# Altium PCB PS_DC-DC_15V_24V.PcbDoc (part 1 of 2)
Units mm, origin at the board's own origin, x right, y up, seen from the top; angles counter-clockwise.
Board outline 210 x 80 mm, 2 copper layers (Top Layer, Bottom Layer), stack 2.071 mm thick; 176 components, 72 nets, 404 pads, 116 vias.
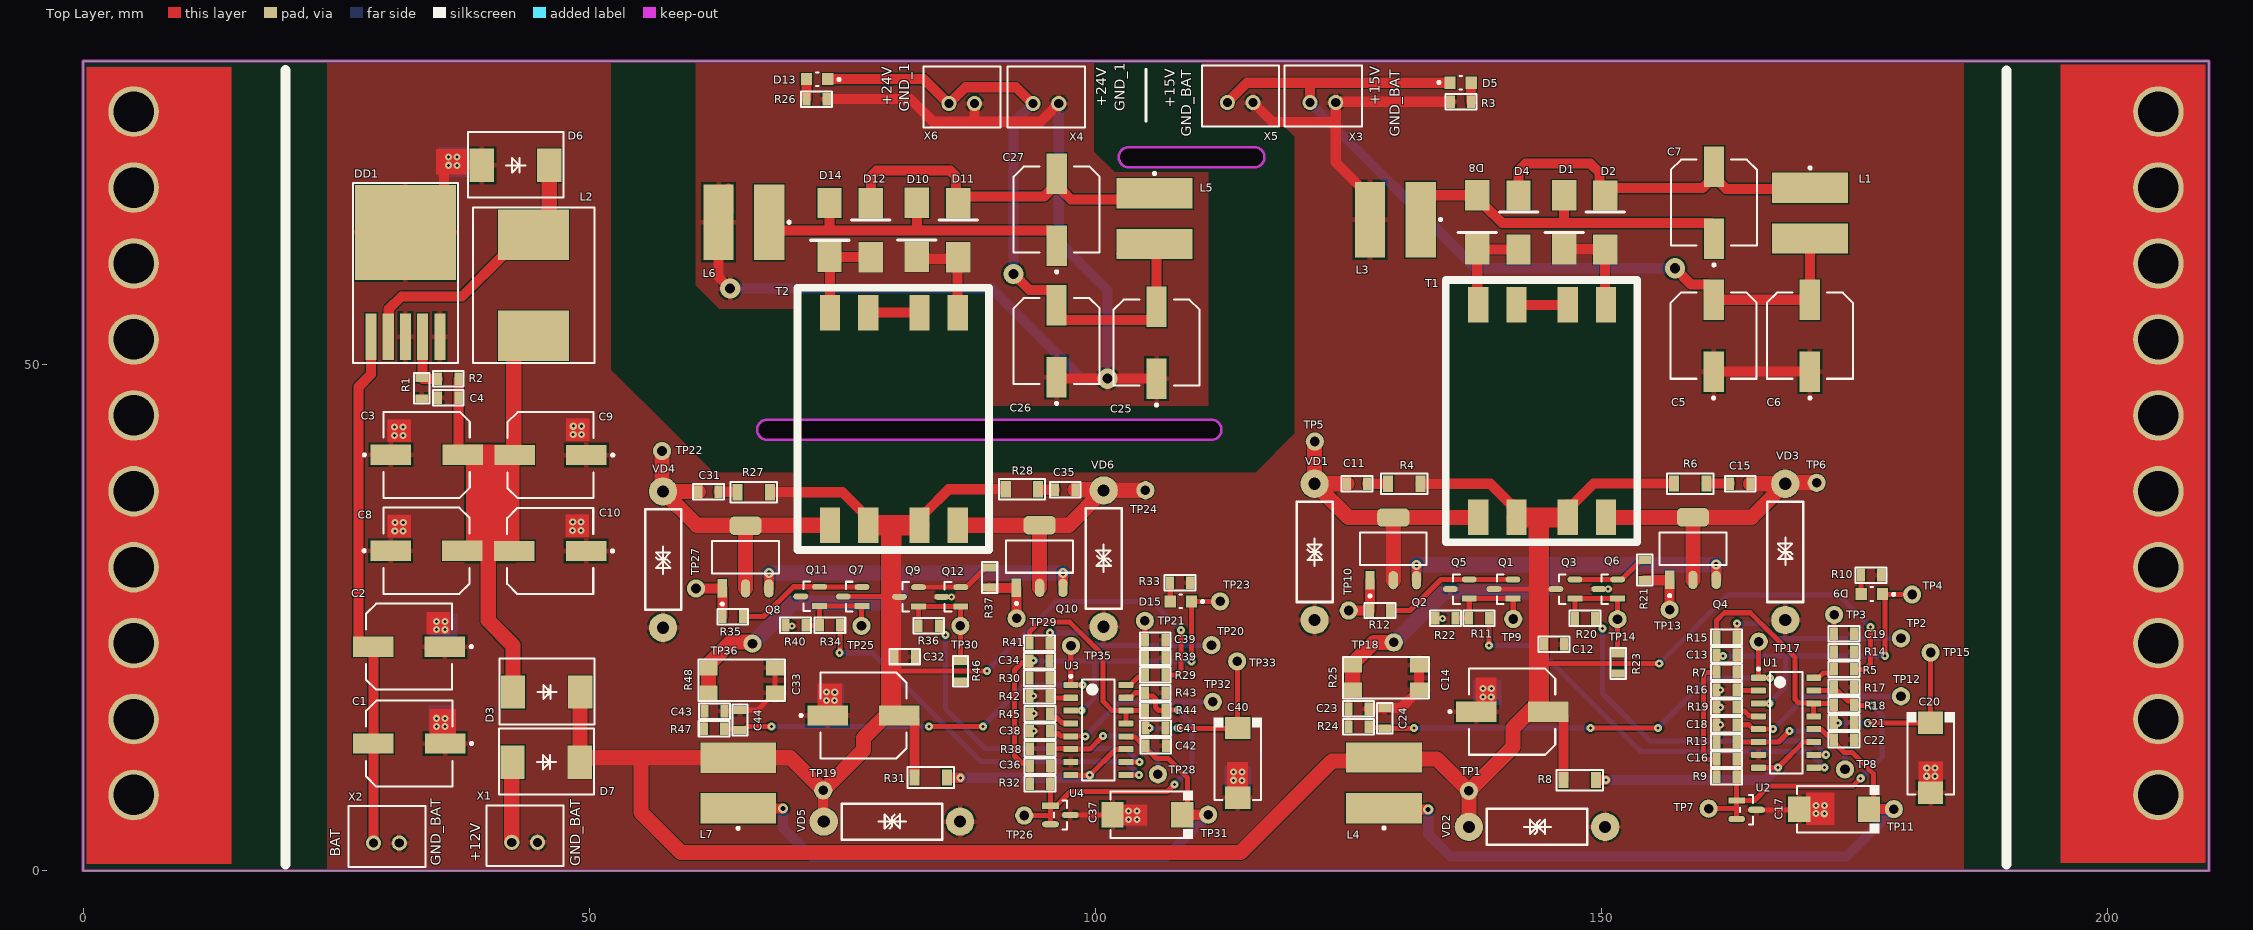
[diagram p0: Top Layer view]
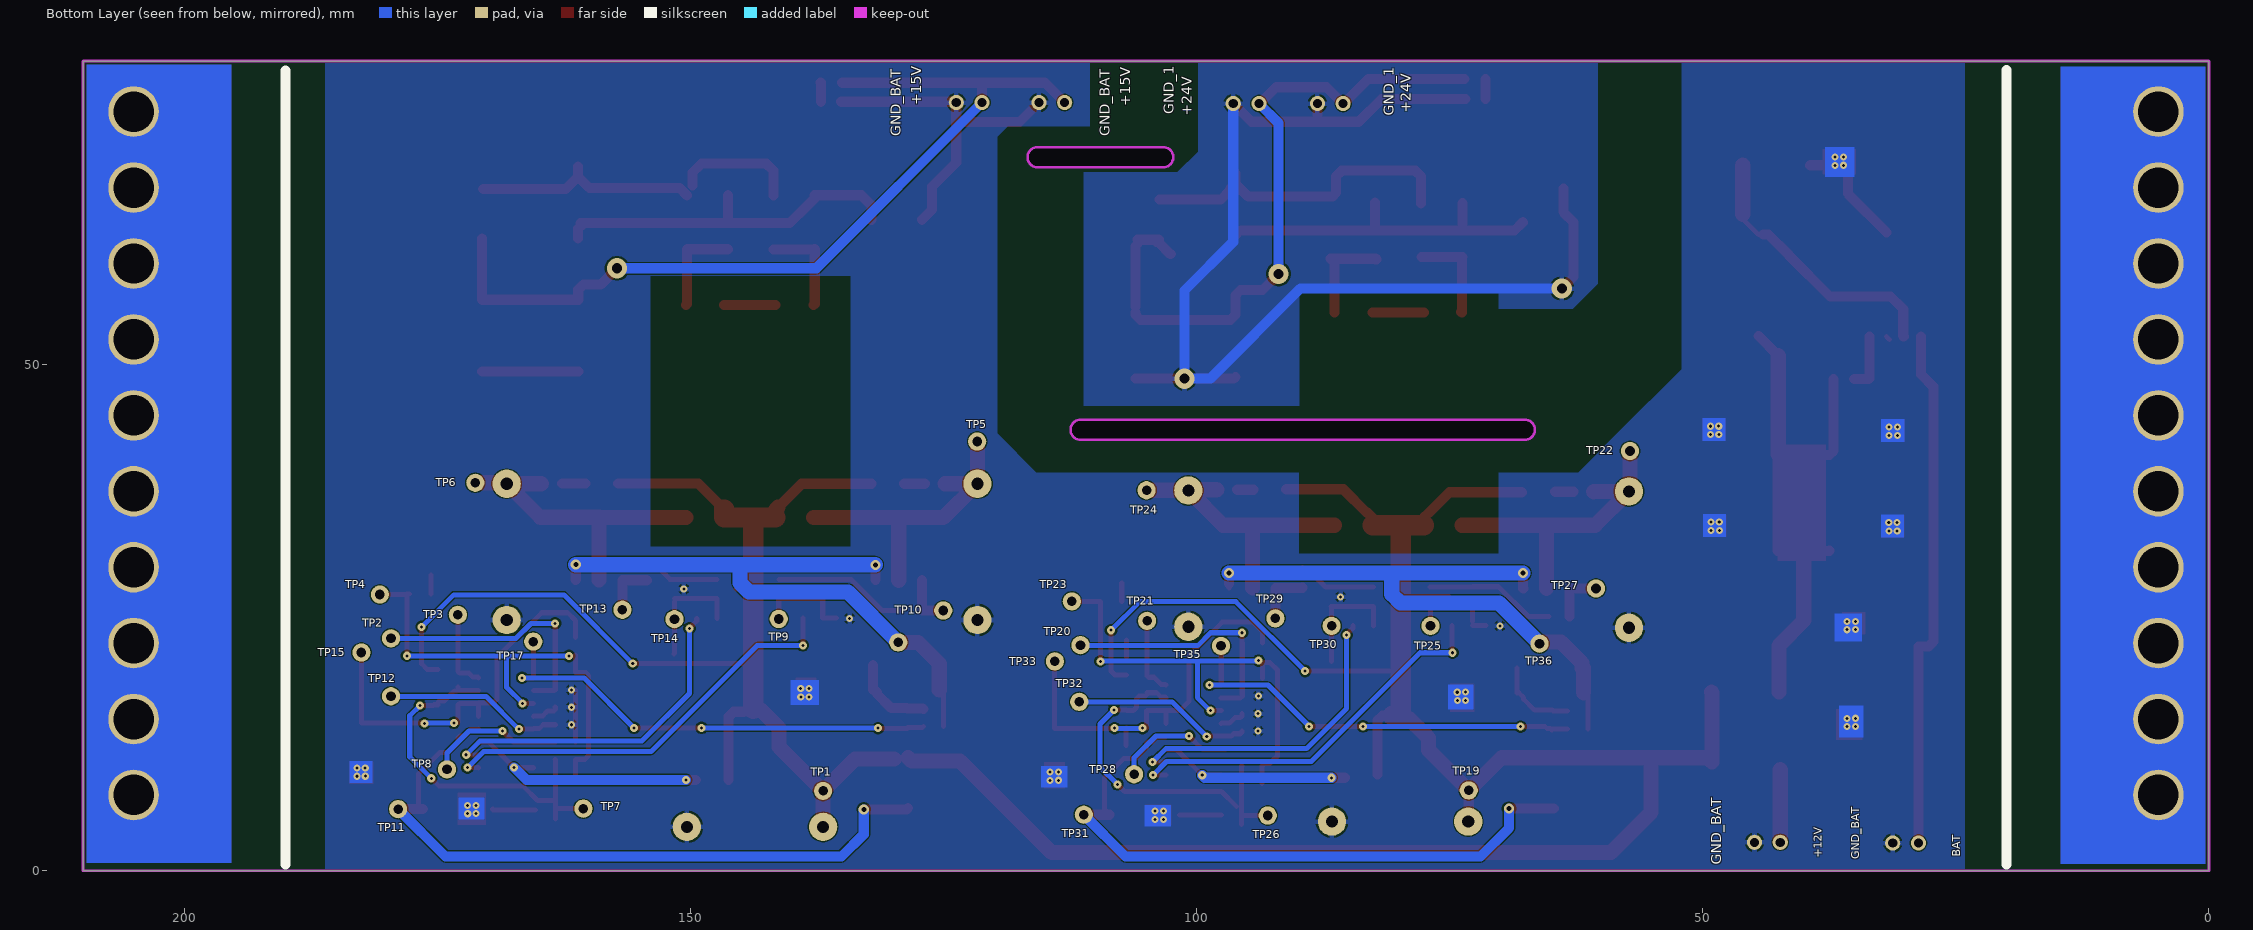
[diagram p1: Bottom Layer view, seen from below]
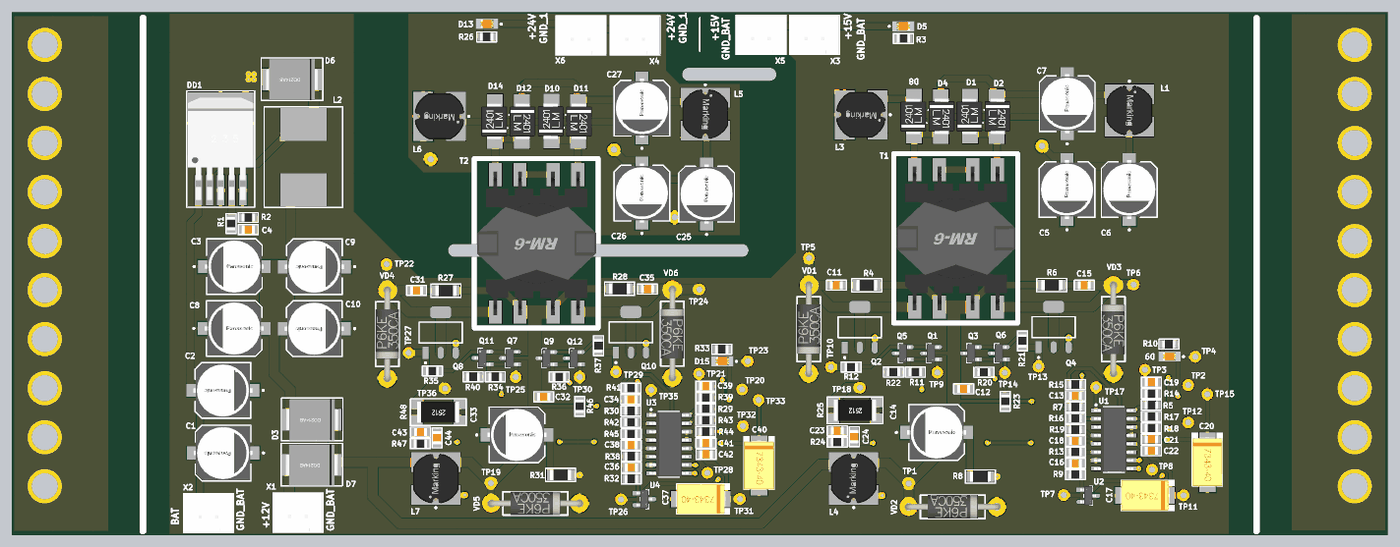
[diagram p2: 3D render of the assembled board from above, using the file's embedded part models]

## Layer stack, top to bottom
Top Solder: solder mask 0.0102, Solder Resist, Dk 3.5
Top Layer: signal copper 0.0356
Dielectric 1: dielectric 2, FR-4, Dk 4.8
Bottom Layer: signal copper 0.0356
Bottom Solder: solder mask 0.0102, Solder Resist, Dk 3.5

## Board outline
0,0 0,80 210,80 210,0
cut-out: 67.588,42.575 111.45,42.575 ccw(c111.45,43.575) 111.45,44.575 67.588,44.575 ccw(c67.588,43.575)
cut-out: 103.305,69.5 cw(c103.305,70.5) 103.305,71.5 115.7,71.5 cw(c115.7,70.5) 115.7,69.5

## Design rules (kind name [scope] priority, off if disabled: settings)
Clearance [All] p1: gap=0.2 ignorepadtopadclearanceinfootprint=TRUE except(0: Region-Hole Text-Hole; 0.1: Track-Track Track-SMDPad Track-THPad Track-Via Track-Fill Track-Poly Track-Region Track-Text Track-Hole SMDPad-SMDPad SMDPad-THPad SMDPad-Via SMDPad-Fill SMDPad-Poly SMDPad-Region SMDPad-Text SMDPad-Hole THPad-THPad THPad-Via THPad-Fill THPad-Poly THPad-Region THPad-Text THPad-Hole; 0.254: Region-Region Region-Text Text-Text)
ComponentClearance [All] p1: gap=-5 collisioncheckmode=3 verticalgap=0.254 showdistances=FALSE
DiffPairsRouting [All] p1: maxlimit=5 minlimit=0.254 mostfreqgap=0.254 toplayer_minwidth=0.381 toplayer_maxwidth=0.381 toplayer_prefwidth=0.381 bottomlayer_minwidth=0.381 bottomlayer_maxwidth=0.381 bottomlayer_prefwidth=0.381 maxuncoupledlength=12.7
Height [All] p1: minheight=0 maxheight=150 prefheight=50
HoleSize [All] p1: absolutevalues=TRUE maxlimit=10 minlimit=0.025 maxpercent=80.000 minpercent=20.000
HoleToHoleClearance [All] p1: gap=0 allowstackedmicrovias=TRUE
MinimumSolderMaskSliver [All] p1: minsoldermaskwidth=0
PlaneClearance [All] p1: clearance=0.7
PlaneConnect [All] p1: planeconnectstyle=Relief reliefexpansion=0.2 reliefentries=4 reliefconductorwidth=0.3 reliefairgap=0.1
PolygonConnect [All] p1: connectstyle=Relief reliefconductorwidth=0.5 reliefentries=4 polygonreliefangle="90 Angle" airgapwidth=0.2
RoutingVias [All] p1: holewidth=0.711 width=1.27 viastyle="Through Hole" minholewidth=0.3 minwidth=0.8 maxholewidth=10 maxwidth=10
SilkToSilkClearance [All] p1: silktosilkclearance=0
SilkToSolderMaskClearance [IsPad] p1: minsilkscreentomaskgap=0 clearancetoexposedcopper=TRUE
SolderMaskExpansion [All] p1: expansion=0.102 istentingtop=FALSE
Width [All] p1: maxlimit=7 minlimit=0.254 preferedwidth=2 minimp=50.000000 maximp=50.000000 favimp=50.000000
20 further rules are at their usual default settings.

## Components (designator, comment, footprint, x,y, rotation, side; value= is the part's Value field where it differs from the comment)
C1 "47uF 63V" CAP_SMD_Size_G 32.225,12.575 r180 top
C2 "47uF 63V" CAP_SMD_Size_G 32.2,22.15 r180 top
C3 "330uF 16V" CAP_SMD_Size_G 33.95,41.1 r0 top
C4 "100nF" CAP-0805 36.075,46.75 r180 top value=1u
C5 "CAP-POLAR" CAP_SMD_Size_G 161.077,52.865 r90 top
C6 "CAP-POLAR" CAP_SMD_Size_G 170.577,52.865 r90 top
C7 "CAP-POLAR" CAP_SMD_Size_G 161.102,66.013 r90 top
C8 "330uF 16V" CAP_SMD_Size_G 33.925,31.625 r0 top
C9 "330uF 16V" CAP_SMD_Size_G 46.175,41.075 r180 top
C10 "330uF 16V" CAP_SMD_Size_G 46.15,31.6 r180 top
C11 "CAP-V" CAP-0805 125.852,38.238 r180 top
C12 "0.01uF" CAP-0805 145.3,22.4 r180 top
C13 "100nF" CAP-0805 162.352,21.338 r180 top value="10,000 pF"
C14 "470uF_25V" CAP_SMD_Size_G 141.175,15.725 r0 top
C15 "CAP-V" CAP-0805 163.702,38.238 r180 top
C16 "100nF" CAP-0805 162.352,11.013 r0 top value="10,000 pF"
C17 "470uF_25V" CAP-TAN-D 172.977,6.088 r180 top
C18 "C0805C102K5RACTU" CAP-0805 162.352,14.438 r180 top value="1,000 pF"
C19 "100nF" CAP-0805 173.952,23.413 r0 top value="10,000 pF"
C20 "100uF" CAP-TAN-D 182.5,11.175 r270 top
C21 "0.1uF" CAP-0805 173.952,14.663 r180 top
C22 "0.01uF" CAP-0805 173.952,12.939 r180 top
C23 "0.47uF" CAP-0805 126,16 r180 top
C24 "470 pF" CAP-0805 128.6,15.075 r270 top
C25 "CAP-POLAR" CAP_SMD_Size_G 106.043,52.177 r90 top
C26 "CAP-POLAR" CAP_SMD_Size_G 96.168,52.327 r90 top
C27 "CAP-POLAR" CAP_SMD_Size_G 96.175,65.325 r90 top
C31 "CAP-V" CAP-0805 61.769,37.452 r180 top
C32 "0.01uF" CAP-0805 81.175,21.175 r180 top
C33 "470uF_25V" CAP_SMD_Size_G 77.094,15.352 r0 top
C34 "100nF" CAP-0805 94.469,20.777 r180 top value="10,000 pF"
C35 "CAP-V" CAP-0805 97.019,37.652 r180 top
C36 "100nF" CAP-0805 94.544,10.352 r0 top value="10,000 pF"
C37 "470uF_25V" CAP-TAN-D 105.144,5.552 r180 top
C38 "C0805C102K5RACTU" CAP-0805 94.519,13.802 r180 top value="1,000 pF"
C39 "100nF" CAP-0805 105.919,22.802 r0 top value="10,000 pF"
C40 "100uF" CAP-TAN-D 114.05,10.675 r270 top
C41 "0.1uF" CAP-0805 105.944,14.102 r180 top
C42 "0.01uF" CAP-0805 105.969,12.377 r180 top
C43 "0.47uF" CAP-0805 62.369,15.777 r180 top
C44 "470 pF" CAP-0805 64.894,14.902 r270 top
D1 "US1G" DO-214AA 146.302,61.79 r90 top
D2 "US1G" DO-214AA 150.352,66.34 r270 top
D3 "SS54" DO-214AB 45.825,17.675 r180 top
D4 "US1G" DO-214AA 141.802,66.34 r270 top
D5 "151031YS06000" LED_RED 136.075,77.85 r0 top
D6 "SS54" DO-214AB 42.75,69.7 r180 top
D7 "SS54" DO-214AB 45.775,10.75 r180 top
D8 "US1G" DO-214AA 137.727,61.79 r90 top
D9 "151031YS06000" LED_RED 176.7,27.35 r180 top
D10 "US1G" DO-214AA 82.369,61.049 r90 top
D11 "US1G" DO-214AA 86.444,65.577 r270 top
D12 "US1G" DO-214AA 77.819,65.577 r270 top
D13 "151031YS06000" LED_RED 72.515,78.209 r180 top
D14 "US1G" DO-214AA 73.744,61.027 r90 top
D15 "151031YS06000" LED_RED 108.444,26.627 r180 top
DD1 "LM2576HV" TO-263-5 31.85,56.275 r0 top
L1 "390µH, 0.38A" WE-PD2_7850 170.6,64.975 r270 top
L2 "100uH" CDRH127 44.5,57.85 r270 top
L3 "390µH, 0.38A" WE-PD2_7850 129.625,64.325 r180 top
L4 "390µH, 0.38A" WE-PD2_7850 128.5,8.7 r90 top
L5 "390µH, 0.38A" WE-PD2_7850 105.85,64.425 r270 top
L6 "390µH, 0.38A" WE-PD2_7850 65.275,64.075 r180 top
L7 "390µH, 0.38A" WE-PD2_7850 64.719,8.677 r90 top
Q1 "SS8050-G" FP-SOT-23-IPC_B 140.304,27.84 r180 top locked
Q2 "IRFL024NTRPBF" FP-PG-SOT223-3-IPC_B 129.427,31.813 r90 top
Q3 "SS8050-G" FP-SOT-23-IPC_B 146.428,27.84 r180 top locked
Q4 "IRFL024NTRPBF" FP-PG-SOT223-3-IPC_B 159.027,31.838 r90 top
Q5 "MMSS8550-H-TP" FP-SOT-23-IPC_B 135.993,27.84 r180 top locked
Q6 "MMSS8550-H-TP" FP-SOT-23-IPC_B 150.657,27.84 r180 top locked
Q7 "SS8050-G" FP-SOT-23-IPC_B 76.024,27.102 r180 top
Q8 "IRFL024NTRPBF" FP-PG-SOT223-3-IPC_B 65.444,31.002 r90 top
Q9 "SS8050-G" FP-SOT-23-IPC_B 81.592,27.077 r180 top
Q10 "IRFL024NTRPBF" FP-PG-SOT223-3-IPC_B 94.494,31.052 r90 top
Q11 "MMSS8550-H-TP" FP-SOT-23-IPC_B 71.823,27.12 r180 top
Q12 "MMSS8550-H-TP" FP-SOT-23-IPC_B 85.767,27.077 r180 top locked
R1 "1K" RES-0805 33.45,47.675 r90 top
R2 "9K1" RES-0805 36.075,48.6 r0 top
R3 "10K" RES-0805 136.1,75.975 r0 top
R4 "10 OMH" RES-1206 130.502,38.238 r180 top
R5 "10K" RES-0805 173.952,19.914 r180 top
R6 "10 OMH" RES-1206 158.752,38.263 r180 top
R7 "200K" RES-0805 162.352,19.613 r180 top
R8 "10 OMH" RES-1206 147.85,8.975 r180 top
R9 "200K" RES-0805 162.352,9.288 r0 top
R10 "220" RES-0805 176.625,29.225 r180 top
R11 "470" RES-0805 137.902,24.963 r0 top
R12 "10" RES-0805 128.125,25.725 r180 top
R13 "12K" RES-0805 162.352,12.739 r180 top
R14 "1.2K" RES-0805 173.952,21.663 r0 top
R15 "2K" RES-0805 162.352,23.063 r180 top
R16 "2K" RES-0805 162.352,17.888 r180 top
R17 "2K" RES-0805 173.952,18.163 r0 top
R18 "2K" RES-0805 173.952,16.413 r180 top
R19 "10K" RES-0805 162.352,16.163 r0 top
R20 "470" RES-0805 148.377,24.938 r0 top
R21 "10" RES-0805 154.277,29.713 r270 top
R22 "2K" RES-0805 134.577,24.963 r0 top
R23 "2K" RES-0805 151.628,20.5 r90 top
R24 "1K" RES-0805 126,14.25 r180 top
R25 "10 OMH" RES-2512 128.7,19.1 r180 top
R26 "10K" RES-0805 72.465,76.234 r180 top
R27 "10 OMH" RES-1206 66.244,37.402 r180 top
R28 "10 OMH" RES-1206 92.744,37.702 r180 top
R29 "10K" RES-0805 105.919,19.352 r180 top
R30 "200K" RES-0805 94.494,19.027 r180 top
R31 "10 OMH" RES-1206 83.75,9.225 r180 top
R32 "200K" RES-0805 94.544,8.627 r0 top
R33 "220" RES-0805 108.369,28.452 r180 top
R34 "470" RES-0805 73.769,24.252 r0 top
R35 "10" RES-0805 64.175,25.125 r180 top
R36 "470" RES-0805 83.544,24.227 r0 top
R37 "10" RES-0805 89.544,28.977 r270 top
R38 "12K" RES-0805 94.544,12.077 r180 top
R39 "1.2K" RES-0805 105.919,21.077 r0 top
R40 "2K" RES-0805 70.394,24.252 r0 top
R41 "2K" RES-0805 94.494,22.502 r180 top
R42 "2K" RES-0805 94.494,17.277 r180 top
R43 "2K" RES-0805 105.919,17.602 r0 top
R44 "2K" RES-0805 105.919,15.852 r180 top
R45 "10K" RES-0805 94.519,15.526 r0 top
R46 "2K" RES-0805 86.675,19.725 r90 top
R47 "1K" RES-0805 62.344,14.027 r180 top
R48 "10 OMH" RES-2512 65.069,18.827 r180 top
T1 "RM-6" TRANS_RM6 144.127,45.415 r90 top
T2 "RM-6" TRANS_RM6 80.094,44.652 r90 top
TP1 "" Test_Point 136.9,7.9 r0 top
TP2 "Test_Point_PCB" Test_Point 179.575,22.975 r0 top
TP3 "Test_Point_PCB" Test_Point 172.975,25.3 r0 top
TP4 "Test_Point_PCB" Test_Point 180.675,27.3 r0 top
TP5 "" Test_Point 121.677,42.413 r0 top
TP6 "" Test_Point 171.252,38.338 r0 top
TP7 "" Test_Point 160.575,6.15 r0 top
TP8 "" Test_Point 174.05,10.025 r0 top
TP9 "" Test_Point 141.277,24.888 r0 top
TP10 "" Test_Point 125.025,25.725 r0 top
TP11 "" Test_Point 178.875,6.1 r0 top
TP12 "Test_Point_PCB" Test_Point 179.575,17.25 r0 top
TP13 "" Test_Point 156.725,25.8 r0 top
TP14 "" Test_Point 151.577,24.863 r0 top
TP15 "Test_Point_PCB" Test_Point 182.5,21.575 r0 top
TP17 "" Test_Point 165.525,22.65 r0 top
TP18 "" Test_Point 129.475,22.575 r0 top
TP19 "" Test_Point 73.119,7.952 r0 top
TP20 "Test_Point_PCB" Test_Point 111.469,22.302 r0 top
TP21 "Test_Point_PCB" Test_Point 104.894,24.702 r0 top
TP22 "" Test_Point 57.194,41.477 r0 top
TP23 "Test_Point_PCB" Test_Point 112.325,26.625 r0 top
TP24 "" Test_Point 104.944,37.602 r0 top
TP25 "" Test_Point 76.894,24.202 r0 top
TP26 "" Test_Point 92.975,5.475 r0 top
TP27 "" Test_Point 60.55,27.9 r0 top
TP28 "" Test_Point 106.175,9.547 r0 top
TP29 "" Test_Point 92.219,24.952 r0 top
TP30 "" Test_Point 86.669,24.202 r0 top
TP31 "" Test_Point 111.144,5.552 r0 top
TP32 "Test_Point_PCB" Test_Point 111.594,16.702 r0 top
TP33 "Test_Point_PCB" Test_Point 114,20.7 r0 top
TP35 "" Test_Point 97.594,22.227 r0 top
TP36 "" Test_Point 66.125,22.45 r0 top
U1 "TL494CDR" D0016A_N 168.227,14.638 r0 top
U2 "TL431" TL431_SOT-23-3(A) 164.327,6.038 r0 top
U3 "TL494CDR" D0016A_N 100.294,13.927 r0 top
U4 "TL431" TL431_SOT-23-3(A) 96.544,5.527 r0 top
VD1 "Suppressor" P6KE350CA 121.652,31.515 r90 top
VD2 "Suppressor" P6KE350CA 143.625,4.35 r180 top
VD3 "Suppressor" P6KE350CA 168.152,31.515 r270 top
VD4 "Suppressor" P6KE350CA 57.294,30.752 r90 top
VD5 "Suppressor" P6KE350CA 79.9,4.875 r180 top
VD6 "Suppressor" P6KE350CA 100.819,30.852 r270 top
X1 "CONN-2-PIN" XH2- 42.35,2.825 r0 top
X2 "CONN-2-PIN" XH2- 28.7,2.75 r0 top
X3 "CONN-2-PIN" XH2- 121.2,75.9 r0 top
X4 "CONN-2-PIN" XH2- 93.84,75.8 r0 top
X5 "CONN-2-PIN" XH2- 113.035,75.9 r0 top
X6 "CONN-2-PIN" XH2- 85.525,75.8 r0 top

## Footprints (in the part's own frame and the unit in brackets; to place one, negate y for a bottom-side part, rotate by r counter-clockwise, add the part's x,y. Pads: shape width x height; smd on the part's side, far side on the other; paste and mask are expansions set on the pad)
CAP-0805 [mm]
  rect 0.8x1.25 smd mask+0.015: 1(-1,0) 2(1,0)
  silkscreen extent -1.52,-0.76 1.52,0.76, body extent -1,-0.62 1,0.63, height 0.8
CAP-TAN-D [mm]
  rect 2.2x2.5 smd: 1(-3.45,0) 2(3.45,0)
  silkscreen extent -4.5,-2.4 3.65,2.4, body extent -3.8,-2.3 3.8,2.3, height 4
CAP_SMD_Size_G [mm]
  rect 4x2 smd paste+0 mask+0: 1(3.55,0) 2(-3.55,0)
  silkscreen extent -6.28,-4.25 4.25,4.25, body extent -5.8,-4.5 5.8,4.5, height 0.25
CDRH127 [mm]
  rect 5x7 smd: 1(-5,0) 2(5,0)
  silkscreen extent -7.7,-6 7.7,6, body extent -6.17,-6 6.17,6, height 7
D0016A_N [mm] "SOIC, 16-Leads, Body 10x4mm, Pitch 1.27mm, IPC Medium Density"
  rrect17% 1.45x0.6 smd: 1(-2.725,4.445) 2(-2.725,3.175) 3(-2.725,1.905) 4(-2.725,0.635) 5(-2.725,-0.635) 6(-2.725,-1.905) 7(-2.725,-3.175) 8(-2.725,-4.445) 9(2.725,-4.445) 10(2.725,-3.175) 11(2.725,-1.905) 12(2.725,-0.635) 13(2.725,0.635) 14(2.725,1.905) 15(2.725,3.175) 16(2.725,4.445)
  silkscreen extent -2.85,-5 1.6,5.42, body extent -3,-4.95 3,4.95, height 1.59
DO-214AA [mm]
  rect 3x2.4 smd: 1(-0.381,0) 2(4.953,0)
  silkscreen extent 1.27,-1.91 1.27,1.91, body extent -0.53,-1.85 5.07,2.1, height 2.65
DO-214AB [mm]
  rect 2.4x3.3 smd: 1(-3.3,0) 2(3.35,0)
  silkscreen extent -4.7,-3.3 4.7,3.2, body extent -4.06,-3.15 4.06,3.15, height 2.67
FP-PG-SOT223-3-IPC_B [mm]
  rect 1.814x0.913 smd paste+0 mask+0: 1(-3.095,2.3)
  rrect100% 1.814x0.913 smd paste+0 mask+0: 2(-3.095,0) 3(-3.095,-2.3)
  rrect50% 1.814x3.172 smd paste+0 mask+0: 4(3.095,0)
  silkscreen extent -4.77,-3.3 1.6,3.3
FP-SOT-23-IPC_B [mm]
  rect 1.474x0.585 smd paste+0 mask+0: 1(-0.935,0.95)
  rrect100% 1.474x0.585 smd paste+0 mask+0: 2(-0.935,-0.95) 3(0.935,0)
  silkscreen extent 0,-1.46 0.65,1.46, body extent -1.2,-1.46 1.2,1.46, height 1.25
LED_RED [mm]
  rect 1.1x1.2 smd paste+0 mask+0: 1(-1.05,0) 2(1.05,0)
  silkscreen extent -2.27,-0.67 0.13,0.67, body extent -1.7,-0.77 1.7,0.77, height 0.25
P6KE350CA [mm]
  round 2.8 hole 1.2: 1(-6.731,0) 2(6.731,0)
  silkscreen extent -4.95,-1.78 4.95,1.78, body extent -7.26,-1.8 7.26,1.8, height 6.9
RES-0805 [mm]
  rect 0.8x1.25 smd mask+0.015: 1(-1,0) 2(1,0)
  silkscreen extent -1.52,-0.76 1.52,0.76, body extent -1,-0.62 1,0.63, height 0.6
RES-1206 [mm]
  rect 1x1.6 smd: 1(-1.6,0) 2(1.6,0)
  silkscreen extent -2.29,-1.02 2.29,1.02, body extent -1.6,-0.8 1.6,0.8, height 0.6
RES-2512 [mm]
  rect 1.8x1.45 smd: 1(-3.275,-1.225) 1(-3.275,1.225) 2(3.275,-1.225) 2(3.275,1.225)
  silkscreen extent -4.28,-2.05 4.25,2.05, body extent -3.2,-1.6 3.2,1.6, height 0.6
Test_Point [mm]
  round 1.8 hole 0.95: 1(0,0)
TL431_SOT-23-3(A) [mm]
  rect 1.659x0.627 smd paste+0 mask+0: 1(-0.977,0.915)
  rrect100% 1.659x0.627 smd paste+0 mask+0: 2(-0.977,-0.915) 3(0.977,0)
  silkscreen extent -0.65,-1.45 0.65,1.45, body extent -1.2,-1.45 1.2,1.45, height 1.1
TO-263-5 [mm]
  rect 1.1x4.6 smd: 1(-3.4,-3.5) 2(-1.7,-3.5) 3(0,-3.5) 4(1.7,-3.5) 5(3.4,-3.5)
  rect 10x9.4 smd: 3(0,6.8)
  silkscreen extent -5.2,-6.1 5.2,11.7, body extent -5,-4.99 5,10.68, height 4.88
TRANS_RM6 [mm]
  rect 3.5x2 smd: 1(-10.5,6.3) 2(-10.5,2.54) 3(-10.5,-2.54) 4(-10.5,-6.3) 5(10.5,-6.3) 6(10.5,-2.54) 7(10.5,2.54) 8(10.5,6.3)
  silkscreen extent -12.95,-9.4 12.95,9.53, body extent -11,-9.08 11,9.08, height 12.68
WE-PD2_7850 [mm] "SMD Power Inductor, 2-Leads, body 7.8x7mm"
  rect 3x7.5 smd: 1(-2.5,0) 2(2.5,0)
  silkscreen extent -4.59,-0.12 -4.34,0.13, body extent -3.81,-3.5 3.81,3.5, height 4.95
XH2- [mm]
  round 1.5 hole 0.9: 1(0,0) 2(2.54,0)
  silkscreen extent -2.5,-2.35 5.13,3.65, body extent -2.4,-2.25 5,3.55, height 7

## Part data
C1 C2 C3 C8 C9 C10: library part CAP_POL_SMD
C4: library part CC0805KKX5R9BB105, "1uF ±10% 50V X5R 0805 Multilayer Ceramic Capacitors MLCC - SMD/SMT RoHS", Manufacturer=Yageo, ComponentLink1Description="Database URL", ComponentLink1URL=http://el.udtech.dev/component/651/detail, ID=C-00125, In Stock=0, Part Number=CC0805KKX5R9BB105
C12 C21 C22 C23 C24 C32 C41 C42 C43 C44: library part CAP-NON-POLAR
C13 C16 C19 C34 C36 C39: library part CMP-2007-00254-2, "CAP CER 10000PF 50V X7R 0805", Capacitance="10,000 pF", Manufacturer=KEMET, Manufacturer Part Number=C0805C103J5RACTU, Package=C0805C-DN, Temperature="-55°C to +125°C", Temperature Characteristic=X7R, Temperature Coefficient=30ppm/°C, Temperature Range High=+125°C, Temperature Range Low=-55°C, Tolerance=0.05, Voltage Rating="50 V", Automotive=No, Category=Cap, ComponentLink2Description=Datasheet, ComponentLink2URL=https://content.kemet.com/datasheets/KEM_C1003_C0G_SMD.pdf, Device Class L1="Passive Components", Device Class L2=Capacitors, Device Class L3="Ceramic Capacitors", Digikey Description="CAP CER 10000PF 50V X7R 0805", Height=0.88mm, Ipc Land Pattern Name=CAPC200125X78, Lead Free=Yes, Material=Ceramic, Mouser Description="Capacitor; Ceramic; Cap 0.01uF; Tol 5%; Vol-Rtg 50 V; SMT; Case 0805; X7R; TR", Octopart=https://octopart.com/c0805c103j5ractu-kemet-133473, RoHS=TRUE
C14 C17 C20 C33 C37 C40: library part CAP-POLAR
C18 C38: library part CMP-2007-01097-2, "CAP CER 1000PF 50V X7R 0805", Capacitance="1,000 pF", Manufacturer=KEMET, Package=C0805C-DN, Temperature="-55°C to +125°C", Temperature Characteristic=X7R, Temperature Coefficient=30ppm/°C, Temperature Range High=+125°C, Temperature Range Low=-55°C, Tolerance=0.1, Voltage Rating="50 V", Automotive=No, Category=Cap, ComponentLink2Description=Datasheet, ComponentLink2URL=https://content.kemet.com/datasheets/KEM_C1003_C0G_SMD.pdf, Device Class L1="Passive Components", Device Class L2=Capacitors, Device Class L3="Ceramic Capacitors", Digikey Description="CAP CER 1000PF 50V X7R 0805", Height=0.88mm, Ipc Land Pattern Name=CAPC200125X78, Lead Free=Yes, Manufacturer Part Number=C0805C102K5RACTU, Material=Ceramic, Mouser Description="Cap Ceramic 0.001uF 50V X7R 10% SMD 0805 125C Plastic T/R", Octopart=https://octopart.com/c0805c102k5ractu-kemet-93010, RoHS=TRUE
D3 D6 D7: library part ES3D-DO214AB, "ES3D-DO214AB"
D5 D9 D13 D15: library part LED, "WURTH ELEKTRONIK - 151031YS06000 - LED, Yellow, Through Hole, T-1 (3mm), 30 mA, 2 V, 590 nm", Manufacturer_Name="Wurth Elektronik", Mouser Part Number=710-151031YS06000, Datasheet Link=https://katalog.we-online.de/led/datasheet/151031YS06000.pdf, Geometry.Height=5.5mm, Manufacturer_Part_Number=151031YS06000, Mouser Price/Stock=https://www.mouser.co.uk/ProductDetail/Wurth-Elektronik/151031YS06000?qs=LlUlMxKIyB3xSYYW%252BcuBiQ%3D%3D
L1 L3 L4 L5 L6 L7: library part 744775239, "WE-PD2 SMT Power Inductor, size 7850, 390µH, 0.38A, 1.77Ω", Case/Size Code=7850, DC Resistance=1.151Ω, DC Resistance Max=1.77Ω, Inductance=390µH, Manufacturer="Wurth Elektronik", Operating Temperature Max=125°C, Operating Temperature Min=-40°C, Rated Current=0.38A, Saturation Current=0.43A, Self Resonant Frequency=3.9MHz, Category="Unshielded Power Inductors", ComponentLink1Description="Website Link", ComponentLink1URL=https://www.we-online.com/redexpert/article/744775239?ad, ComponentLink2Description="Datasheet Link", ComponentLink2URL=https://www.we-online.com/redexpert/spec/744775239?ad, Height=4.95mm, Length=7.8mm, Manufacturer Part Number=744775239, Match Code=WE-PD2, Mount="Surface Mount", Packaging="Tape and Reel", Width=7mm
L2: library part IND-CONST
Q1 Q3 Q7 Q9: library part CMP-20235-000001-1, "NPN TRANSISTOR 1.5A 40V SOT-23 R", Case/Package=TO-236-3, Collector Emitter Breakdown Voltage=25V, Collector Emitter Voltage (VCEO)=400mV, Max Collector Current=1.5A, Max Power Dissipation=300mW, Transition Frequency=100MHz, Max Breakdown Voltage=25V, Mount="Surface Mount", Packaging="Tape and Reel", RoHS Compliant=Yes
Q2 Q4 Q8 Q10: library part CMP-32901-001217-1, "MOSFET N-CH 55V 2.8A SOT223", Case/Package=SOT-223, Continuous Drain Current (ID)=2.8A, Drain to Source Breakdown Voltage=55V, Drain to Source Resistance=75mR, Gate to Source Voltage (Vgs)=20V, Input Capacitance=400pF, Max Operating Temperature=150°C, Max Power Dissipation=1W, Min Operating Temperature=-55°C, Power Dissipation=2.1W, Threshold Voltage=4V, Drain to Source Voltage (Vdss)=55V, Halogen Free="Halogen Free", Height=0.057inch, Lead Free="Contains Lead", Length=0.263inch, Max Dual Supply Voltage=55V, Mount="Surface Mount", Number of Pins=3, Packaging="Cut Tape", Polarization=N, Rds On Max=75mR, Reach SVHC Compliant=Yes, RoHS Compliant=Yes, Series=HEXFET®, Turn-Off Delay Time=22.2ns, Turn-On Delay Time=8.1ns, Width=0.146inch
Q5 Q6 Q11 Q12: library part CMP-56214-000002-1, "TRANS PNP 25V 1.5A SOT23", Case/Package=SOT-23, Collector Base Voltage (VCBO)=40V, Collector Emitter Breakdown Voltage=25V, Collector Emitter Saturation Voltage=500mV, Emitter Base Voltage (VEBO)=1.6V, Max Collector Current=1.5A, Max Operating Temperature=150°C, Max Power Dissipation=625mW, Min Operating Temperature=-55°C, Package Quantity=1, Transition Frequency=100MHz, Collector Emitter Voltage (VCEO)=500mV, Element Configuration=Single, Gain Bandwidth Product=100MHz, hFE Min=40, Lead Free="Lead Free", Max Breakdown Voltage=25V, Mount="Surface Mount", Packaging="Tape and Reel", Polarity=PNP
R1 R2: library part RES-CONST, "10K"
R3 R4 R6 R8 R10 R11 R12 R19 R20 R21 R22 R23 R24 R25 R26 R27 R28 R31 R33 R34 R35 R36 R37 R40 R45 R46 R47 R48: library part RES-CONST
R5 R7 R9 R14 R15 R17 R18 R29 R30 R32 R39 R41 R43 R44: library part CMP-2001-04908-2, "RES Thick Film, 2kΩ, 1%, 0.125W, 100ppm/°C, 0805", Case Code (Imperial)=0805, Case Code (Metric)=2012, Max Operating Temperature=155°C, Min Operating Temperature=-55°C, Package Quantity=5000, Power Rating=125mW, Resistance=10kR, Temperature Coefficient=100ppm/°C, Tolerance=1%, Voltage Rating=150V, Case/Package=0805, Composition="Thick Film", Contact Plating=Tin, Depth=1.25mm, Height=0.45mm, Lead Free="Lead Free", Length=2mm, Military Standard=Not, Packaging="Tape and Reel", Radiation Hardening=No, Termination=SMD/SMT, Voltage Rating (DC)=150V, Weight=0.000194oz, Width=1.25mm
R13 R38: library part CMP-2001-04908-2, "RES Thick Film, 12kΩ, 1%, 0.125W, 100ppm/°C, 0805", Case Code (Imperial)=0805, Case Code (Metric)=2012, Max Operating Temperature=155°C, Min Operating Temperature=-55°C, Package Quantity=5000, Power Rating=125mW, Resistance=10kR, Temperature Coefficient=100ppm/°C, Tolerance=1%, Voltage Rating=150V, Case/Package=0805, Composition="Thick Film", Contact Plating=Tin, Depth=1.25mm, Height=0.45mm, Lead Free="Lead Free", Length=2mm, Military Standard=Not, Packaging="Tape and Reel", Radiation Hardening=No, Termination=SMD/SMT, Voltage Rating (DC)=150V, Weight=0.000194oz, Width=1.25mm
R16 R42: library part CMP-2001-04908-2, "RES Thick Film, 82kΩ, 1%, 0.125W, 100ppm/°C, 0805", Case Code (Imperial)=0805, Case Code (Metric)=2012, Max Operating Temperature=155°C, Min Operating Temperature=-55°C, Package Quantity=5000, Power Rating=125mW, Resistance=10kR, Temperature Coefficient=100ppm/°C, Tolerance=1%, Voltage Rating=150V, Case/Package=0805, Composition="Thick Film", Contact Plating=Tin, Depth=1.25mm, Height=0.45mm, Lead Free="Lead Free", Length=2mm, Military Standard=Not, Packaging="Tape and Reel", Radiation Hardening=No, Termination=SMD/SMT, Voltage Rating (DC)=150V, Weight=0.000194oz, Width=1.25mm
T1 T2: library part RM_6_12-12-18-18
TP1 TP2 TP3 TP4 TP5 TP6 TP7 TP8 TP9 TP10 TP11 TP12 TP13 TP14 TP15 TP17 TP18 TP19 TP20 TP21 TP22 TP23 TP24 TP25 TP26 TP27 TP28 TP29 TP30 TP31 TP32 TP33 TP35 TP36: library part TP_PCB?, "Test_Point"
U1 U3: library part CMP-0319-00950-2, "Pulse-Width-Modulation Control Circuit with Voltage Control, 45 % Duty Cycle, 0 to +70 degC, 16-pin SOIC (D), Green (RoHS & no Sb/Br)", Frequency(Max)(kHz)=300, Manufacturer="Texas Instruments", Rating=Military, Code_JEDEC=MS-012AC, ComponentLink1Description=Datasheet, ComponentLink1URL=http://www.ti.com/general/docs/lit/getliterature.tsp?genericPartNumber=TL494&fileType=pdf, Control Method=Voltage, DatasheetVersion=SLVS074E, Duty Cycle(Max)(%)=45, Eco-Plan="Green (RoHS & no Sb/Br)", Mounting Technology="Surface Mount", PackageDescription="16-Pin Plastic Small Outline Integrated Circuit, 9.9 x 3.9 mm, Pitch 1.27 mm Pitch", PackageReference=D0016A, PackageVersion="revM, Jun-2011", PartNumber=TL494CDR, Regulated Outputs(#)=2, SubFamily="PWM Controller", Topology="Boost, Buck, Flyback, Forward, Full-Bridge, Half-Bridge, Push-Pull"
U2 U4: library part TL431_SOT-23-3, "TL431_SOT-23-3"

## Free pads (board coordinates)
  round 5 hole 4: 6(5,7.5) 6(5,15) 6(5,22.5) 6(5,30) 6(5,37.5) 6(5,45) 6(5,52.5) 6(5,75) 6(5,60) 6(5,67.5) 6(205,7.5) 6(205,15) 6(205,22.5) 6(205,30) 6(205,37.5) 6(205,45) 6(205,52.5) 6(205,60) 6(205,67.5) 6(205,75)

## Via types
v1: diameter 0.7, hole 0.3, Top Layer to Bottom Layer, 62 vias
v2: diameter 0.8, hole 0.3, Top Layer to Bottom Layer, 44 vias
v3: diameter 1, hole 0.5, Top Layer to Bottom Layer, 6 vias
v4: diameter 2, hole 1, Top Layer to Bottom Layer, 4 vias

## Nets (pads, with @x,y where several pads share a name; then routed paths per layer and width w, separated by ;. In a path a pad name is that pad's centre, name@x,y a point inside that pad or via, vN(x,y) a via of type N, cw(c..) or ccw(c..) an arc to the next point about the centre after c; other vN are vias at no path point)
+12V: C12.2 C14.1 C32.2 C33.1 D3.1 D7.1 L4.2 L7.2 Q1.3 Q3.3 Q7.3 Q9.3 R4.1 R5.1 R6.2 R8.2 R27.1 R28.2 R29.1 R31.2 T1.2 T1.3 T2.2 T2.3 TP1.1 TP19.1 VD2.2 VD5.2 | length 357
  Top Layer w0.5: Q7.3 79.799,27.102 79.825,27.077 ; 79.825,19.742 89.267,19.742 v2(89.275,19.75) ; T2.3@82.634,34.777 83.384,35.527 83.395,35.527 T2.3@82.832,34.684 ; R29.1 108.051,19.351 108.45,19.75 v2(108.45,23.775) ; Q1.3 143.8,27.84 Q3.3 ; 143.8,20.235 144.065,20.5 155.675,20.5 v2(155.7,20.475) ; R5.1 176.013,19.913 176.55,20.45 v2(176.55,24.1)
  Top Layer w1: R27.1 75.019,37.402 77.019,35.402 77.054,35.402 77.554,34.902 T2.2 ; TP19.1 73.119,4.596 VD5.2@73.188,4.527 ; C33.1 81.644,15.352 82.144,14.852 R31.2@82.144,9.55 ; T2.3 82.634,34.777 82.634,34.902 83.134,35.402 83.219,35.402 85.519,37.702 R28.2 ; R4.1 139.014,38.238 T1.2@141.337,35.915 ; C14.1 145.725,15.725 146.225,15.225 R8.2@146.225,8.975 ; T1.3@146.917,35.953 149.227,38.263 R6.2
  Top Layer w1.5: D3.1 49.075,17.625 D7.1 49.502,11.177 55.114,11.177 ; C33.1@79.825,15.255 79.672,15.102 79.074,15.102 77.094,13.122 77.094,11.927 TP19.1 69.894,11.177 L7.2 55.114,11.177 ; L4.2 128.147,10.847 123.372,10.847 114.35,1.825 59.075,1.825 55.114,5.786 55.114,11.177 ; L4.2@129.846,11.05 133.75,11.05 TP1.1 ; VD2.2 136.9,4.356 TP1.1 ; T1.2@141.337,35.915 141.587,35.665 T1.2 ; C14.1@143.8,15.998 143.123,15.998 141.25,14.125 141.25,12.25 TP1.1 ; T1.3@146.667,35.703 146.705,35.703 146.917,35.915 T1.3@146.917,35.953
  Top Layer w2: T2.2 79.825,34.152 ; C33.1 79.825,15.352 79.825,19.742 79.825,27.077 79.825,34.152 ; T2.3 79.825,34.152 ; T1.2 143.8,34.915 ; C14.1@143.8,15.998 143.8,20.235 143.8,27.84 143.8,34.915 ; T1.3@146.667,35.703 T1.3 143.8,34.915
  Bottom Layer w0.5: v2(89.275,19.75) 96.125,26.6 105.625,26.6 v2(108.45,23.775) ; v2(155.7,20.475) 162.5,27.275 173.375,27.275 v2(176.55,24.1)
+15V: C5.1 C6.1 D5.1 L1.2 X3.1 X5.1 | length 89.1
  Top Layer w1: X5.1 114.985,77.85 121.448,77.85 ; X3.1 121.2,77.602 121.448,77.85 ; D5.1 121.448,77.85 ; v4(157.25,59.525) 158.86,57.915 160.577,57.915 161.077,57.415 C5.1 C6.1 170.577,62.452 L1.2
  Bottom Layer w1: X3.1 137.575,59.525 v4(157.25,59.525) v4@157.175,59.45
+24V: C25.1 C26.1 D13.1 L5.2 X4.1 X6.1 | length 68.6
  Top Layer w1: D13.1 83.075,78.209 85.525,75.759 87.175,77.409 92.165,77.409 X4.1@93.84,75.734 ; v4(91.9,58.975) 93.498,57.377 95.668,57.377 96.168,56.877 96.168,54.927 96.668,54.427 105.543,54.427 106.043,54.927 C25.1@106.043,55.152 ; L5.2@102.55,60.925 102.6,60.925 103.711,62.036 103.711,62.35 L5.2@104.167,62.35 ; L5.2@103.939,62.122 L5.2@104.167,62.35 ; L5.2 106.043,61.732 C25.1 ; L5.2@105.85,62.35 L5.2@104.167,62.35
  Bottom Layer w1: v4(91.9,58.975) 91.9,73.86 X4.1
BAT: C1.1 C2.1 DD1.1 X2.1 | length 51.7
  Top Layer w0.5: DD1.1 DD1.1@28.475,52.75
  Top Layer w1: DD1.1 28.45,49.05 27.225,47.825 27.225,22.65 27.725,22.15 C2.1 ; X2.1 28.7,12.575 C2.1@28.7,22.15
BAT_GND: C1.2 C2.2 C3.2 C4.2 C5.2 C6.2 C8.2 C9.2 C10.2 C12.1 C14.2 C17.2 C18.2 C19.2 C20.2 C21.1 C22.1 C23.1 C24.1 C32.1 C33.2 C37.2 C38.2 C39.2 C40.2 C41.1 C42.1 C43.1 C44.1 D6.2 DD1.3 DD1.5 L3.2 Q5.3 Q6.3 Q11.3 Q12.3 R1.1 R3.1 R10.1 R13.2 R14.2 R16.2 R17.2 R19.1 R22.1 R23.1 R25.1 R33.1 R38.2 R39.2 R40.1 R42.2 R43.2 R45.1 R46.1 R48.1 U1.7 U2.3 U3.7 U4.3 VD1.1 VD2.1 VD3.2 VD4.1 VD5.1 VD6.2 X1.2 X2.2 X3.2 X5.2 | length 88.4
  Top Layer w0.5: DD1.3@31.575,52.5 DD1.3@31.85,52.775 ; C43.1 64.769,15.776 C44.1 66.644,15.902 67.694,16.952 67.694,17.127 68.169,17.602 68.344,17.602 R48.1@68.344,20.052 ; U4.3 C37.2@101.669,5.527 ; R39.2 C39.2 ; C41.1 106.956,14.089 106.956,12.389 C42.1 ; R13.2 C18.2 R19.1 R16.2 ; U2.3 169.477,6.038 C17.2
  Top Layer w1: DD1.3@31.85,63.075 35.675,66.9 35.675,69.114 36.261,69.7 D6.2 ; X5.2 117.5,73.975 123.74,73.975 ; C23.1 127.038,16.037 128.563,16.037 C24.1 130.175,16.075 131.575,17.475 131.575,17.65 131.8,17.875 131.975,17.875 R25.1@131.975,20.325 ; L3.2 126.125,65.325 126.125,67.6 123.74,69.985 123.74,73.975 ; R3.1 123.815,75.975 X3.2 123.74,73.975 ; C5.2 C6.2
  other v1: 103.27,5.078 104.1,5.075 171.17,5.653 172,5.65 103.276,5.903 104.106,5.9 171.176,6.478 172.006,6.475 113.645,8.953 114.475,8.95 182.12,9.353 182.95,9.35 113.651,9.778 114.481,9.775 182.126,10.178 182.956,10.175 93.919,13.801 34.92,14.253 35.75,14.25 161.752,14.438 35.756,15.075 34.926,15.078 93.919,15.527 161.752,16.164 73.42,16.828 74.25,16.825 138.27,17.178 139.1,17.175 93.894,17.276 73.426,17.653 74.256,17.65 161.752,17.888 138.276,18.003 139.106,18 34.92,23.828 35.75,23.825 70.05,24.2 35.756,24.65 34.926,24.653 134.275,24.925 85.767,27.077 150.657,27.84 30.795,33.578 31.625,33.575 48.37,33.628 49.2,33.625 30.801,34.403 31.631,34.4 48.376,34.453 49.206,34.45 30.77,43.028 31.6,43.025 48.42,43.103 49.25,43.1 30.776,43.853 31.606,43.85 48.426,43.928 49.256,43.925 36.113,69.703 36.944,69.7 36.12,70.528 36.95,70.525
GND_1: C25.2 C26.2 L6.2 R26.1 X4.2 X6.2 | length 117.2
  Top Layer w1: L6.2@63.775,67.4 63.775,65.075 L6.2 62.775,58.675 v4(63.925,57.525) ; R26.1 81.742,76.233 83.971,74.004 88.065,74.004 ; X6.2 88.065,74.004 ; C26.2 96.318,48.627 C25.2 ; X4.2 94.584,74.004 88.065,74.004
  Bottom Layer w1: v4(63.925,57.525) 89.75,57.525 98.648,48.627 v4(101.194,48.627) 101.194,57.331 96.38,62.145 X4.2
NetC3_1: C3.1 C4.1 C8.1 C9.1 C10.1 D3.2 L2.2 R2.2 | length 55
  Top Layer w1: R2.2 C4.1 37.075,41.475 37.475,41.075 40.225,41.075 C9.1 ; C8.1 37.5,31.6 40.025,31.6 C10.1 42.6,41.05 C9.1 ; C9.1@42.55,41.15 C9.1 ; L2.2@42.55,50.9 L2.2
  Top Layer w1.5: 40.025,31.6 40.025,24.725 42.475,22.275 D3.2 ; C9.1@42.55,41.15 L2.2@42.55,50.9
NetC7_1: C7.1 D2.1 D4.1 L1.1 | length 34.8
  Top Layer w1: D4.1 141.802,69.163 142.502,69.863 148.91,69.863 149.791,68.982 D2.1@149.791,67.721 ; D2.1 150.352,66.75 151.052,67.45 159.988,67.45 C7.1@161.102,68.563 ; C7.1 C7.1@161.102,68.563 ; L1.1@170.499,67.375 162.29,67.375 C7.1@161.102,68.563
NetC7_2: C7.2 D1.2 D8.2 L3.1 | length 36.3
  Top Layer w1: L3.1 132.125,65.739 133.125,66.739 134.539,66.739 134.543,66.743 D8.2 137.727,66.443 138.427,65.743 140.157,64.013 146.213,64.013 ; D1.2 146.302,64.103 146.213,64.013 ; C7.2@160.602,63.938 161.102,63.438 C7.2 ; C7.2@160.852,64.013 146.213,64.013
NetC11_1: C11.1 R4.2 | length 2
  Top Layer w1: C11.1 R4.2@128.902,38.238
NetC11_2: C11.2 Q2.2 Q2.4 T1.1 TP5.1 VD1.2 | length 31.1
  Top Layer w1.5: TP5.1 121.652,42.388 VD1.2 VD1.2@121.66,38.238 ; C11.2 VD1.2@121.66,38.238 ; Q2.2 Q2.4 124.99,34.908 VD1.2@121.66,38.238 ; Q2.4@129.427,34.915 T1.1
NetC13_1: C13.1 R7.1 R15.1 R16.1 TP2.1 U1.2 | length 25.6
  Top Layer w0.5: v2(163.375,24.45) 163.352,24.427 R15.1 C13.1 R7.1 R16.1 163.427,17.813 U1.2
  Bottom Layer w0.5: v2(163.375,24.45) 165.75,24.45 167.225,22.975 TP2.1
NetC13_2: C13.2 C16.1 D9.1 R7.2 R9.1 TP4.1 U1.3 | length 44.8
  Top Layer w0.5: R9.1 C16.1 160.436,11.014 160.05,11.4 160.05,19.32 160.343,19.613 R7.2 C13.2 ; U1.3 166.568,16.543 v2(166.575,16.55) ; D9.1 178,27.35 v2(178,21.25) ; D9.1@178,27.3 179.65,27.3
  Bottom Layer w0.5: v2@161.943,21.168 v2@162.057,21.282 ; v2(162,21.225) 168.152,21.225 ; v2(166.575,16.55) 168.152,18.127 168.152,21.225 ; v2(178,21.25) 177.975,21.225 168.152,21.225
NetC15_1: C15.1 Q4.2 Q4.4 T1.4 TP6.1 VD3.1 | length 31.9
  Top Layer w1.5: T1.4 Q4.4@159.027,34.915 ; Q4.2 Q4.4@159.027,34.915 ; C15.1 VD3.1@168.144,38.238 ; TP6.1 168.244,38.338 VD3.1 VD3.1@168.144,38.238 ; Q4.4@159.027,34.915 Q4.4 164.839,34.933 VD3.1@168.144,38.238
NetC15_2: C15.2 R6.1 | length 2.4
  Top Layer w0.5: C15.2@162.677,38.263 C15.2
  Top Layer w1: R6.1 C15.2@162.677,38.263
NetC16_2: C16.2 R9.2 R17.1 R18.1 TP7.1 U1.15 U2.1 U2.2 | length 37
  Top Layer w0.5: TP7.1 163.238,6.15 163.35,6.038 ; U2.2 U2.1 ; C16.2 163.35,11.012 163.35,9.289 U2.1 ; U1.15 R17.1@172.802,17.813 ; R17.1 172.952,17.938 173.102,17.788 173.327,17.788 174.327,16.788 174.802,16.788 174.952,16.638 R18.1 175.352,16.413 175.44,16.325 v2(176.725,16.325) ; v2(175.6,9.15) 174.825,8.375 166.525,8.375 165.103,6.953 U2.1
  Bottom Layer w0.5: v2(175.6,9.15) 177.725,11.275 177.725,15.325 v2(176.725,16.325)
NetC17_1: C17.1 C22.2 L4.1 TP11.1 U1.12 | length 69.8
  Top Layer w0.5: U1.12 171.002,13.953 171.737,13.953 172.377,13.313 172.802,13.313 172.952,13.163 172.952,12.713 173.102,12.563 173.965,11.7 174.75,11.7 176.85,9.6 176.85,6.512 176.438,6.1 C17.1
  Top Layer w1: L4.1 128.625,6.075 v3(132.875,6.075) ; C17.1@176.438,6.1 176.85,6.1 TP11.1
  Bottom Layer w1: v3(132.875,6.075) 132.875,3.625 135.075,1.425 174.2,1.425 TP11.1
NetC18_1: C18.1 TP12.1 U1.5 | length 17.8
  Top Layer w0.5: C18.1 164.552,14.438 164.937,14.053 165.452,14.053 U1.5 166.772,14.003 166.775,14 v2(166.95,14)
  Bottom Layer w0.5: v2(166.95,14) 170.2,17.25 TP12.1
NetC19_1: C19.1 R5.2 R14.1 TP3.1 U1.16 | length 7.9
  Top Layer w0.5: U1.16 171.002,19.133 171.472,19.133 171.877,19.538 172.802,19.538 172.952,19.688 R5.2 R14.1 C19.1 172.963,23.425 172.963,25.288 TP3.1
NetC20_1: C20.1 C21.2 R15.2 R18.2 TP15.1 U1.13 U1.14 | length 39.1
  Top Layer w0.5: R15.2 161.352,24.727 162.125,25.5 164.7,25.5 169.1,21.1 169.1,16.95 169.457,16.593 170.902,16.593 U1.14 ; U1.13 U1.14 ; v2(173.375,14.625) 173.356,14.644 172.971,14.644 C21.2 R18.2 172.822,16.543 U1.14 ; v2(176.275,14.575) 176.3,14.6 182.475,14.6 C20.1 TP15.1@182.5,21.2 ; TP15.1 TP15.1@182.55,21.525
  Bottom Layer w0.5: v2(173.375,14.625) 176.225,14.625 v2(176.275,14.575)
NetC23_2: C23.2 Q2.3 Q4.3 R24.2 R25.2 TP18.1 | length 63.9
  Top Layer w0.5: R24.2 124.999,14.251 C23.2 C23.2 125,17.45 125.025,17.475 125.025,17.65 125.25,17.875 R25.2@125.425,17.875 ; R25.2@125.425,20.325 R25.2@125.425,20.5
  Top Layer w1: v3(131.725,30.225) 131.725,28.72 Q2.3 ; v3(161.325,30.25) Q4.3 Q4.3
  Top Layer w1.5: R25.2@125.425,17.875 125.421,17.879 125.421,20.321 R25.2@125.425,20.325 ; R25.2@125.425,20.5 127.5,22.575 TP18.1
  Bottom Layer w1.5: TP18.1 134.45,27.55 144.221,27.55 145.1,28.429 145.1,30.223 145.127,30.25 ; v3@131.75,30.25 145.127,30.25 ; v3(161.325,30.25) 145.127,30.25
NetC24_2: C24.2 R24.1 TP17.1 U1.1 | length 46
  Top Layer w0.5: R24.1 127.087,14.162 128.513,14.162 C24.2 131.45,14.075 v2(131.475,14.1) ; v2(148.9,14.125) v2(155.575,14.125) ; TP17.1@165.475,22.225 165.502,22.198 U1.1 165.51,19.075 v2(166.625,19.075)
  Bottom Layer w0.5: v2(131.475,14.1) 148.875,14.1 v2(148.9,14.125) ; v2(155.575,14.125) 160.525,19.075 v2(166.625,19.075)
NetC27_1: C27.1 D11.1 D12.1 L5.1 | length 33.1
  Top Layer w1: D12.1 77.819,68.589 78.405,69.175 85.664,69.175 86.25,68.589 86.25,66.958 86.608,66.6 94.9,66.6 C27.1@96.175,67.875 ; C27.1 96.175,67.75 96.3,67.75 96.675,67.375 96.675,67.25 97.6,66.325 L5.1@103.665,66.325
NetC27_2: C27.2 D10.2 D14.2 L6.1 | length 33.9
  Top Layer w1: L6.1 68.598,63.252 73.744,63.252 ; D14.2 73.744,63.252 ; 82.369,63.327 D10.2 ; C27.2@95.6,63.252 82.369,63.252 73.744,63.252 ; C27.2@95.854,63.125 C27.2@96.079,62.9
NetC31_1: C31.1 R27.2 | length 1.8
  Top Layer w1: C31.1 R27.2@64.594,37.451
NetC31_2: C31.2 Q8.2 Q8.4 T2.1 TP22.1 VD4.2 | length 31.6
  Top Layer w1.5: TP22.1 57.194,37.583 VD4.2 ; C31.2 60.738,37.483 VD4.2 ; Q8.2 Q8.4 ; T2.1 60.625,34.152 VD4.2
NetC34_1: C34.1 R30.1 R41.1 R42.1 TP20.1 U3.2 | length 25.1
  Top Layer w0.5: v2(95.519,23.527) 95.519,22.527 R41.1 R30.1 95.494,17.252 95.644,17.102 U3.2
  Bottom Layer w0.5: v2(95.519,23.527) 98.619,23.527 99.894,22.252 TP20.1@111.67,22.252
NetC34_2: C34.2 C36.1 D15.1 R30.2 R32.1 TP23.1 U3.3 | length 46.1
  Top Layer w0.5: C34.2@93.276,20.569 92.744,20.569 92.019,19.844 92.019,11.356 92.741,10.634 93.394,10.634 93.394,10.502 C36.1 R32.1 ; R30.2 C34.2@93.494,20.351 ; U3.3 97.571,15.829 98.641,15.829 v2(98.644,15.827) ; v2(109.494,20.702) 109.506,20.714 109.506,26.614 D15.1 ; D15.1 D15.1 ; TP23.1 D15.1
  Bottom Layer w0.5: v2(93.869,20.776) v2@93.894,20.752 ; v2@93.926,20.719 v2@93.894,20.752 ; v2(98.644,15.827) 99.928,17.111 99.928,20.752 ; v2(109.494,20.702) 109.444,20.752 99.928,20.752 ; v2@93.894,20.752 99.928,20.752
NetC35_1: C35.1 Q10.2 Q10.4 T2.4 TP24.1 VD6.1 | length 29
  Top Layer w1: Q10.4@94.489,34.152 Q10.4
  Top Layer w1.5: T2.4 Q10.4@94.489,34.152 ; Q10.2 Q10.4 97.383,34.147 VD6.1 ; C35.1 100.75,37.652 VD6.1 ; TP24.1 100.838,37.602 VD6.1
NetC35_2: C35.2 R28.1 | length 1.6
  Top Layer w1: R28.1@94.394,37.652 C35.2
NetC36_2: C36.2 R32.2 R43.1 R44.1 TP26.1 U3.15 U4.1 U4.2 | length 36.3
  Top Layer w0.5: TP26.1 95.516,5.475 95.567,5.527 ; C36.2 95.567,10.328 95.567,8.627 U4.2 ; U4.1@96.077,6.377 97.55,7.85 107.125,7.85 v2(107.825,8.55) ; U3.15 103.069,17.152 103.494,17.152 103.944,17.602 R43.1 104.919,17.425 105.069,17.275 105.678,17.275 105.944,17.009 105.944,16.144 106.237,15.851 R44.1 106.968,15.9 v2(108.15,15.9)
  Bottom Layer w0.5: v2(107.825,8.55) 109.544,10.269 109.544,14.506 v2(108.15,15.9)
NetC37_1: C37.1 C42.2 L7.1 TP31.1 U3.12 | length 65.7
  Top Layer w0.5: U3.12 103.069,13.242 103.886,13.242 104.376,12.751 104.819,12.751 104.969,12.601 104.969,12.159 106.026,11.102 107.194,11.102 109.1,9.196 109.1,6.058 C37.1
  Top Layer w1: L7.1 64.746,6.15 v3(69.15,6.15) ; C37.1 TP31.1
  Bottom Layer w1: v3(69.15,6.15) 69.15,4.225 71.95,1.425 107.017,1.425 TP31.1
NetC38_1: C38.1 TP32.1 U3.5 | length 17.8
  Top Layer w0.5: C38.1 95.519,13.696 95.669,13.546 96.349,13.546 96.559,13.337 97.524,13.337 97.551,13.309 98.966,13.309 v2(99,13.275)
  Bottom Layer w0.5: v2(99,13.275) 102.427,16.702 TP32.1
NetC39_1: C39.1 R29.2 R39.1 TP21.1 U3.16 | length 7.7
  Top Layer w0.5: U3.16 103.069,18.422 103.494,18.422 104.201,19.129 104.769,19.129 104.919,19.279 R29.2 R39.1 C39.1 104.906,22.814 104.906,24.689 TP21.1
NetC40_1: C40.1 C41.2 R41.2 R44.2 TP33.1 U3.13 U3.14 | length 37.6
  Top Layer w0.5: R41.2 93.494,23.619 94.45,24.575 97.475,24.575 100.75,21.3 100.75,16.75 101.668,15.832 U3.14 ; U3.13 U3.14 ; C41.2@104.94,14.105 104.94,15.79 104.899,15.832 U3.14 ; v2(108.1,14.1) 108.123,14.077 114.002,14.077 C40.1 114.05,20.65 TP33.1
  Bottom Layer w0.5: v2(105.344,14.101) 105.369,14.077 108.077,14.077 v2(108.1,14.1)
NetC43_2: C43.2 Q8.3 Q10.3 R47.2 R48.2 TP36.1 | length 61.3
  Top Layer w0.5: R47.2 61.344,15.776 R48.2@61.344,17.152 ; Q10.3@96.772,27.979 Q10.3
  Top Layer w1: Q8.3@67.734,27.916 67.75,27.932 v3(67.75,29.425) ; Q10.3@96.8,28.364 v3(96.8,29.425)
  Top Layer w1.5: R48.2@61.794,17.602 61.794,20.052 61.919,20.052 61.944,20.077 61.944,20.544 64,22.6 TP36.1@65.925,22.6
  Bottom Layer w1.5: TP36.1 70.125,26.45 79.846,26.45 80.725,27.329 80.725,29.3 ; v3(67.75,29.425) 80.725,29.425 v3(96.8,29.425)
NetC44_2: C44.2 R47.1 TP35.1 U3.1 | length 42.4
  Top Layer w0.5: R47.1 64.769,14.026 C44.2@64.846,13.95 ; C44.2 65.044,14.052 65.372,14.052 65.571,14.25 v2(68,14.25) ; v2(83.55,14.275) v2(88.9,14.275) ; TP35.1 97.569,22.202 U3.1 98.722,18.372 v2(98.725,18.375)
  Bottom Layer w0.5: v2@67.85,14.275 v2(83.55,14.275) ; v2(88.9,14.275) 88.9,14.325 92.95,18.375 v2(98.725,18.375)
NetD1_1: D1.1 D2.2 T1.5 | length 9.6
  Top Layer w1: D1.1 150.33,61.409 D2.2 150.352,55.99 T1.5
NetD4_2: D4.2 D8.1 T1.8 | length 9.6
  Top Layer w1: T1.8 137.727,56.015 D8.1 137.749,61.387 D4.2
NetD5_2: D5.2 R3.2 | length 1.9
  Top Layer w1: R3.2 137.1,77.825 D5.2
NetD6_1: D6.1 DD1.2 L2.1 | length 27.3
  Top Layer w0.5: L2.1 L2.1@46.5,64.85
  Top Layer w1: DD1.2 30.2,52.825 30.2,55.5 31.45,56.75 37.425,56.75 41.5,60.825 41.5,60.85 43.5,62.85 L2.1@44.05,62.85
  Top Layer w1.5: L2.1@46.05,64.85 D6.1
NetD7_2: D7.2 X1.1 | length 7.2
  Top Layer w1.5: X1.1 D7.2@42.35,10.025
NetD9_2: D9.2 R10.2 | length 1.8
  Top Layer w0.5: D9.2@175.625,27.375 R10.2
NetD10_1: D10.1 D11.2 T2.5 | length 9.8
  Top Layer w1: D10.1@82.219,60.424 82.263,60.468 D11.2@86.769,60.468 ; D10.1@82.344,60.421 D10.1@82.369,60.446 ; T2.5 D11.2@86.394,60.374
NetD12_2: D12.2 D14.1 T2.8 | length 9.6
  Top Layer w1: T2.8@73.869,55.227 T2.8 73.794,60.596 D14.1 77.766,60.646 D12.2@77.769,60.649
NetD13_2: D13.2 R26.2 | length 2
  Top Layer w1: R26.2 D13.2
NetD15_2: D15.2 R33.2 | length 1.8
  Top Layer w0.5: R33.2 107.394,28.426 D15.2
NetDD1_4: DD1.4 R1.2 R2.1 | length 5.7
  Top Layer w1: DD1.4 33.55,48.65 33.575,48.625 33.6,48.6 R2.1
NetQ1_1: Q1.1 Q5.1 R11.1 R22.2 TP9.1 | length 9.6
  Top Layer w0.5: R22.2 R11.1 136.929,24.99 Q5.1 Q1.1 141.277,26.852 TP9.1
NetQ1_2: Q1.2 Q5.2 R12.1 | length 13.4
  Top Layer w0.5: R12.1 131.075,25.725 134.14,28.79 Q5.2 Q1.2
NetQ2_1: Q2.1 R12.2 TP10.1 | length 5.1
  Top Layer w1: TP10.1 R12.2 127.127,25.727 Q2.1
NetQ3_1: Q3.1 Q6.1 R20.1 R23.2 TP14.1 | length 11.4
  Top Layer w0.5: R20.1 147.364,24.952 Q3.1 Q6.1 ; 151.593,26.598 151.593,24.879 TP14.1 151.577,21.488 R23.2@151.627,21.438
NetQ3_2: Q3.2 Q6.2 R21.1 | length 7.7
  Top Layer w0.5: Q3.2 152.014,28.79 152.08,28.856 152.08,28.857 153.786,30.563 154.127,30.563 R21.1
NetQ4_1: Q4.1 R21.2 TP13.1 | length 5.4
  Top Layer w1: R21.2 156.697,28.713 156.725,28.742 TP13.1
NetQ7_1: Q7.1 Q11.1 R34.1 R40.2 TP25.1 | length 9.1
  Top Layer w0.5: R40.2 R34.1 ; R34.1@72.758,24.641 Q11.1 ; Q11.1@72.776,26.152 Q7.1@76.936,26.152 ; TP25.1 76.894,26.11 Q7.1@76.936,26.152 ; Q7.1 Q7.1@76.936,26.152
NetQ7_2: Q7.2 Q11.2 R35.1 | length 13
  Top Layer w0.5: R35.1 67.225,25.125 70.17,28.07 Q11.2 ; Q11.2@72.776,28.052 Q7.2
NetQ8_1: Q8.1 R35.2 TP27.1 | length 5.4
  Top Layer w1: TP27.1 60.557,27.907 Q8.1 63.175,27.876 R35.2
NetQ9_1: Q9.1 Q12.1 R36.1 R46.2 TP30.1 | length 11.6
  Top Layer w0.5: R36.1@82.531,24.214 R36.1 82.544,26.11 Q9.1 86.702,26.127 86.669,26.093 TP30.1 86.675,24.196 R46.2@86.675,20.675
NetQ9_2: Q9.2 Q12.2 R37.1 | length 7.8
  Top Layer w0.5: Q9.2 86.702,28.027 86.719,28.043 87.26,28.043 89.044,29.827 89.394,29.827 R37.1
NetQ10_1: Q10.1 R37.2 TP29.1 | length 5.7
  Top Layer w0.5: Q10.1 Q10.1@92.219,27.932
  Top Layer w1: R37.2 89.564,27.957 Q10.1 ; TP29.1 Q10.1@92.219,27.932
NetR8_1: R8.1 U1.8 U1.11 | length 25
  Top Layer w0.5: U1.8 167.393,10.193 v2(167.425,10.225) 169.915,12.715 170.933,12.715 U1.11
  Top Layer w1: R8.1 v2(150.425,8.975)
  Bottom Layer w1: v2(150.425,8.975) 166.175,8.975 v2(167.425,10.225)
NetR11_2: R11.2 U1.9 | length 41.9
  Top Layer w0.5: v2(138.9,22.275) 138.902,22.277 R11.2 ; U1.9 170.958,10.2 v2(172.025,10.2)
  Bottom Layer w0.5: v2(138.9,22.275) 143.4,22.275 153.875,11.8 170.425,11.8 v2(172.025,10.2)
NetR13_1: R13.1 TP8.1 U1.6 | length 13.7
  Top Layer w0.5: R13.1 163.357,12.733 U1.6 167.483,12.733 v2(168.575,13.825)
  Bottom Layer w0.5: v2(168.575,13.825) 171.875,13.825 174.05,11.65 TP8.1
NetR19_2: R19.2 U1.4 | length 2.7
  Top Layer w0.5: R19.2 163.352,15.939 163.502,15.789 163.794,15.789 ; 163.795,15.788 164.127,15.788 164.592,15.323 165.452,15.323 U1.4
NetR20_2: R20.2 U1.10 | length 33.5
  Top Layer w0.5: R20.2 149.377,24.714 150.1,23.99 v2(150.1,23.95) ; U1.10 170.957,11.469 172.144,11.469 v2(172.15,11.475)
  Bottom Layer w0.5: v2(150.1,23.95) 150.1,17.525 154.775,12.85 170.775,12.85 v2(172.15,11.475)
NetR31_1: R31.1 U3.8 U3.11 | length 20.8
  Top Layer w0.5: U3.8 97.599,9.452 v2(99.444,9.452) 101.989,11.996 102.994,11.996 U3.11
  Top Layer w1: R31.1 85.35,9.2 v2(86.675,9.2)
  Bottom Layer w1: v2(86.675,9.2) 99.192,9.2 v2(99.444,9.452)
NetR34_2: R34.2 U3.9 | length 38.6
  Top Layer w0.5: v2(74.725,21.55) 74.769,21.594 R34.2 ; U3.9 104.289,9.482 v2(104.294,9.477)
  Bottom Layer w0.5: v2(74.725,21.55) 77.925,21.55 88.675,10.8 102.971,10.8 v2(104.294,9.477)
NetR36_2: R36.2 U3.10 | length 31.2
  Top Layer w0.5: R36.2 84.544,24.002 84.694,23.852 84.732,23.852 85.118,23.466 85.118,23.357 v2(85.175,23.3) ; U3.10 v2(104.369,10.752)
  Bottom Layer w0.5: v2(85.175,23.3) 85.175,16.05 89.148,12.077 103.044,12.077 v2(104.369,10.752)
NetR38_1: R38.1 TP28.1 U3.6 | length 13.9
  Top Layer w0.5: R38.1 97.089,12.076 97.144,12.022 U3.6 99.439,12.022 v2(100.744,13.327)
  Bottom Layer w0.5: v2(100.744,13.327) 104.019,13.327 106.175,11.171 TP28.1@106.175,9.325
NetR45_2: R45.2 U3.4 | length 2.6
  Top Layer w0.5: R45.2 95.519,15.302 95.669,15.152 96.194,15.152 96.734,14.612 97.519,14.612 U3.4
NetT1_6: T1.6 T1.7 | length 5.1
  Top Layer w1: T1.7 T1.6
NetT2_6: T2.6 T2.7 | length 5.1
  Top Layer w1: T2.7 T2.6

## Polygon pours and split planes (outlines as drawn)
BAT_GND on Bottom Layer "NONET_L-01_P-001" (solid, pour order 1): 24.1,0 24.1,80 52.1,80 52.1,49.576 58.351,43.325 62.326,39.35 70.175,39.35 70.175,31.325 89.85,31.325 89.9,31.375 89.9,39.35 115.825,39.35 119.7,43.225 119.7,72.525 118.675,73.55 110.557,73.55 110.557,80 186.05,80 186.05,0
GND_1 on Bottom Layer "NONET_L-01_P-001" (solid, pour order 2): 60.375,80 60.375,58 62.85,55.525 70.175,55.525 70.175,58 89.85,58 89.875,57.975 89.875,45.925 111.125,45.925 111.125,69 101.9,69 99.85,71.05 99.85,80
GND_1 on Top Layer "NONET_L-01_P-001" (solid, pour order 3): 60.5,80 60.5,57.875 62.85,55.525 70.175,55.525 70.175,58 89.85,58 89.875,57.975 89.875,45.925 111.125,45.925 111.125,69 101.9,69 99.85,71.05 99.85,80
BAT_GND on Top Layer "NONET_L-01_P-001" (solid, pour order 0): 24.1,0 24.1,80 52.15,80 52.15,49.526 58.351,43.325 62.326,39.35 70.175,39.35 70.175,31.325 89.85,31.325 89.9,31.375 89.9,39.35 115.825,39.35 119.7,43.225 119.7,72.525 118.675,73.55 110.557,73.55 110.557,80 185.8,80 185.8,0

## Keep-outs
Keep-Out Layer:
  lines w0.254: 115.65,69.5 103.305,69.5 cw(c103.305,70.5) 103.305,71.5 115.675,71.5 ; 115.7,69.5 ccw(c115.7,70.5) 115.7,71.5 ; 0,0 0,80 210,80 210,0 0,0 ; 67.588,42.575 cw(c67.588,43.575) 67.588,44.575 111.45,44.575 cw(c111.45,43.575) 111.45,42.575 67.588,42.575

## Other copper
Top Layer:
  rectangle net BAT_GND: 47.675,32.975 49.982,35.2
  rectangle net BAT_GND: 30.1,32.925 32.407,35.15
  rectangle net BAT_GND: 30.075,42.375 32.382,44.6
  rectangle net BAT_GND: 47.725,42.45 50.032,44.675
  rectangle net NetC3_1: 37.85,30.6 42.6,42.1
  rectangle net BAT_GND: 34.875,68.798 38.2,71.325
  rectangle net BAT_GND: 181.3,8.564 183.75,10.8
  rectangle net BAT_GND: 170.175,4.525 173,7.725
  region net BAT_GND: 139.625,16.504 139.625,19.104 137.55,19.104 137.55,16.504
  region net BAT_GND: 115.081,8.15 115.081,10.75 113.007,10.75 113.007,8.15
  rectangle net BAT_GND: 102.475,4.475 105.075,6.55
  rectangle net BAT_GND: 72.55,15.7 74.975,18.5
  rectangle net BAT_GND: 34.225,12.95 36.85,15.975
  rectangle net BAT_GND: 33.925,23.35 36.232,25.575
  rectangle: 0.359,0.675 14.675,79.425
  rectangle: 195.359,0.775 209.675,79.675
  pour cut-out: 134.225,58.75 134.225,32.075 153.9,32.075 153.9,58.75
  pour cut-out: 70.175,58 70.175,31.325 89.85,31.325 89.85,58
Bottom Layer:
  rectangle net BAT_GND: 47.7,32.975 49.982,35.25
  rectangle net BAT_GND: 30.125,32.925 32.407,35.2
  rectangle net BAT_GND: 30.1,42.375 32.382,44.65
  rectangle net BAT_GND: 47.75,42.45 50.032,44.725
  rectangle net BAT_GND: 35,68.55 37.95,71.5
  rectangle net BAT_GND: 112.735,8.245 115.36,10.37
  rectangle net BAT_GND: 34.15,13.175 36.525,16.325
  rectangle net BAT_GND: 34.25,22.675 37,25.45
  rectangle net BAT_GND: 72.625,15.925 75.15,18.4
  rectangle net BAT_GND: 102.525,4.4 105.15,6.525
  rectangle net BAT_GND: 137.3,16.4 140.125,18.875
  rectangle net BAT_GND: 170.325,5.075 172.925,7.25
  rectangle net BAT_GND: 181.425,8.7 183.7,10.85
  rectangle: 195.359,0.775 209.675,79.675
  rectangle: 0.359,0.675 14.675,79.475
  pour cut-out: 134.225,58.75 134.225,32.075 153.9,32.075 153.9,58.75
  pour cut-out: 70.175,58 70.175,31.325 89.85,31.325 89.85,58

## Silkscreen, mask and mechanical layers (free items; w line width, h text height)
Top Overlay:
  lines w0.254: 105,74.05 105,79.175
  lines w1: 20,0.625 20,79.125 ; 190,0.65 190,79.075
  text "+15V" at 128.096,75.629 h1 r90
  text "+24V" at 79.871,75.579 h1 r90
  text "+24V" at 101.096,75.479 h1 r90
  text "+15V" at 107.821,75.404 h1 r90
  text "GND_1" at 102.904,75.054 h1 r90
  text "GND_1" at 81.629,75.004 h1 r90
  text "GND_BAT" at 109.454,72.529 h1 r90
  text "GND_BAT" at 130.079,72.504 h1 r90
  text "BAT" at 25.396,1.404 h1 r90
  text "+12V" at 39.221,0.879 h1 r90
  text "GND_BAT" at 35.354,0.529 h1 r90
  text "GND_BAT" at 49.094,0.483 h1 r90
Bottom Overlay:
  lines w1: 20,0.625 20,79.125 ; 190,0.65 190,79.075
  text "+15V" at 127.204,75.629 h1 r270
  text "+15V" at 106.579,75.554 h1 r270
  text "+24V" at 78.829,74.904 h1 r270
  text "GND_1" at 102.246,74.729 h1 r270
  text "GND_1" at 80.521,74.604 h1 r270
  text "+24V" at 100.479,74.604 h1 r270
  text "GND_BAT" at 108.596,72.554 h1 r270
  text "GND_BAT" at 129.221,72.554 h1 r270
  text "TP5" at 122.746,43.704 h0.8
  text "TP22" at 61.521,41.154 h0.8
  text "TP6" at 175.171,38.004 h0.8
  text "TP24" at 106.546,35.304 h0.8
  text "TP23" at 115.496,27.904 h0.8
  text "TP4" at 184.121,27.904 h0.8
  text "TP27" at 64.971,27.804 h0.8
  text "TP29" at 94.096,26.504 h0.8
  text "TP21" at 106.895,26.281 h0.8
  text "TP13" at 160.921,25.504 h0.8
  text "TP10" at 129.796,25.404 h0.8
  text "TP3" at 176.415,24.954 h0.8
  text "TP2" at 182.421,24.129 h0.8
  text "TP20" at 115.121,23.279 h0.8
  text "TP9" at 142.271,22.754 h0.8
  text "TP14" at 153.896,22.604 h0.8
  text "TP30" at 88.821,22.004 h0.8
  text "TP25" at 78.496,21.854 h0.8
  text "TP15" at 186.796,21.204 h0.8
  text "TP35" at 102.263,21.006 h0.8
  text "TP17" at 169.146,20.879 h0.8
  text "TP36" at 67.546,20.354 h0.8
  text "TP33" at 118.521,20.329 h0.8
  text "TP12" at 181.846,18.629 h0.8
  text "TP32" at 113.921,18.154 h0.8
  text "TP8" at 177.546,10.204 h0.8
  text "TP28" at 110.621,9.654 h0.8
  text "TP19" at 74.696,9.479 h0.8
  text "TP1" at 138.096,9.379 h0.8
  text "TP7" at 158.846,5.979 h0.8
  text "TP11" at 180.871,3.929 h0.8
  text "TP31" at 113.321,3.304 h0.8
  text "TP26" at 94.471,3.229 h0.8
  text "BAT" at 24.579,1.404 h0.8 r270